# Altium PCB PCB1.PcbDoc (part 3 of 3)
Units mm, origin at the board's own origin, x right, y up, seen from the top; angles counter-clockwise.
Board outline 100 x 48 mm, 4 copper layers (Top Layer, Top GND, Bottom VM, Bottom Layer), stack 1.513 mm thick; 171 components, 136 nets, 609 pads, 571 vias.
Unrouted connection lines stored in the file: 44.
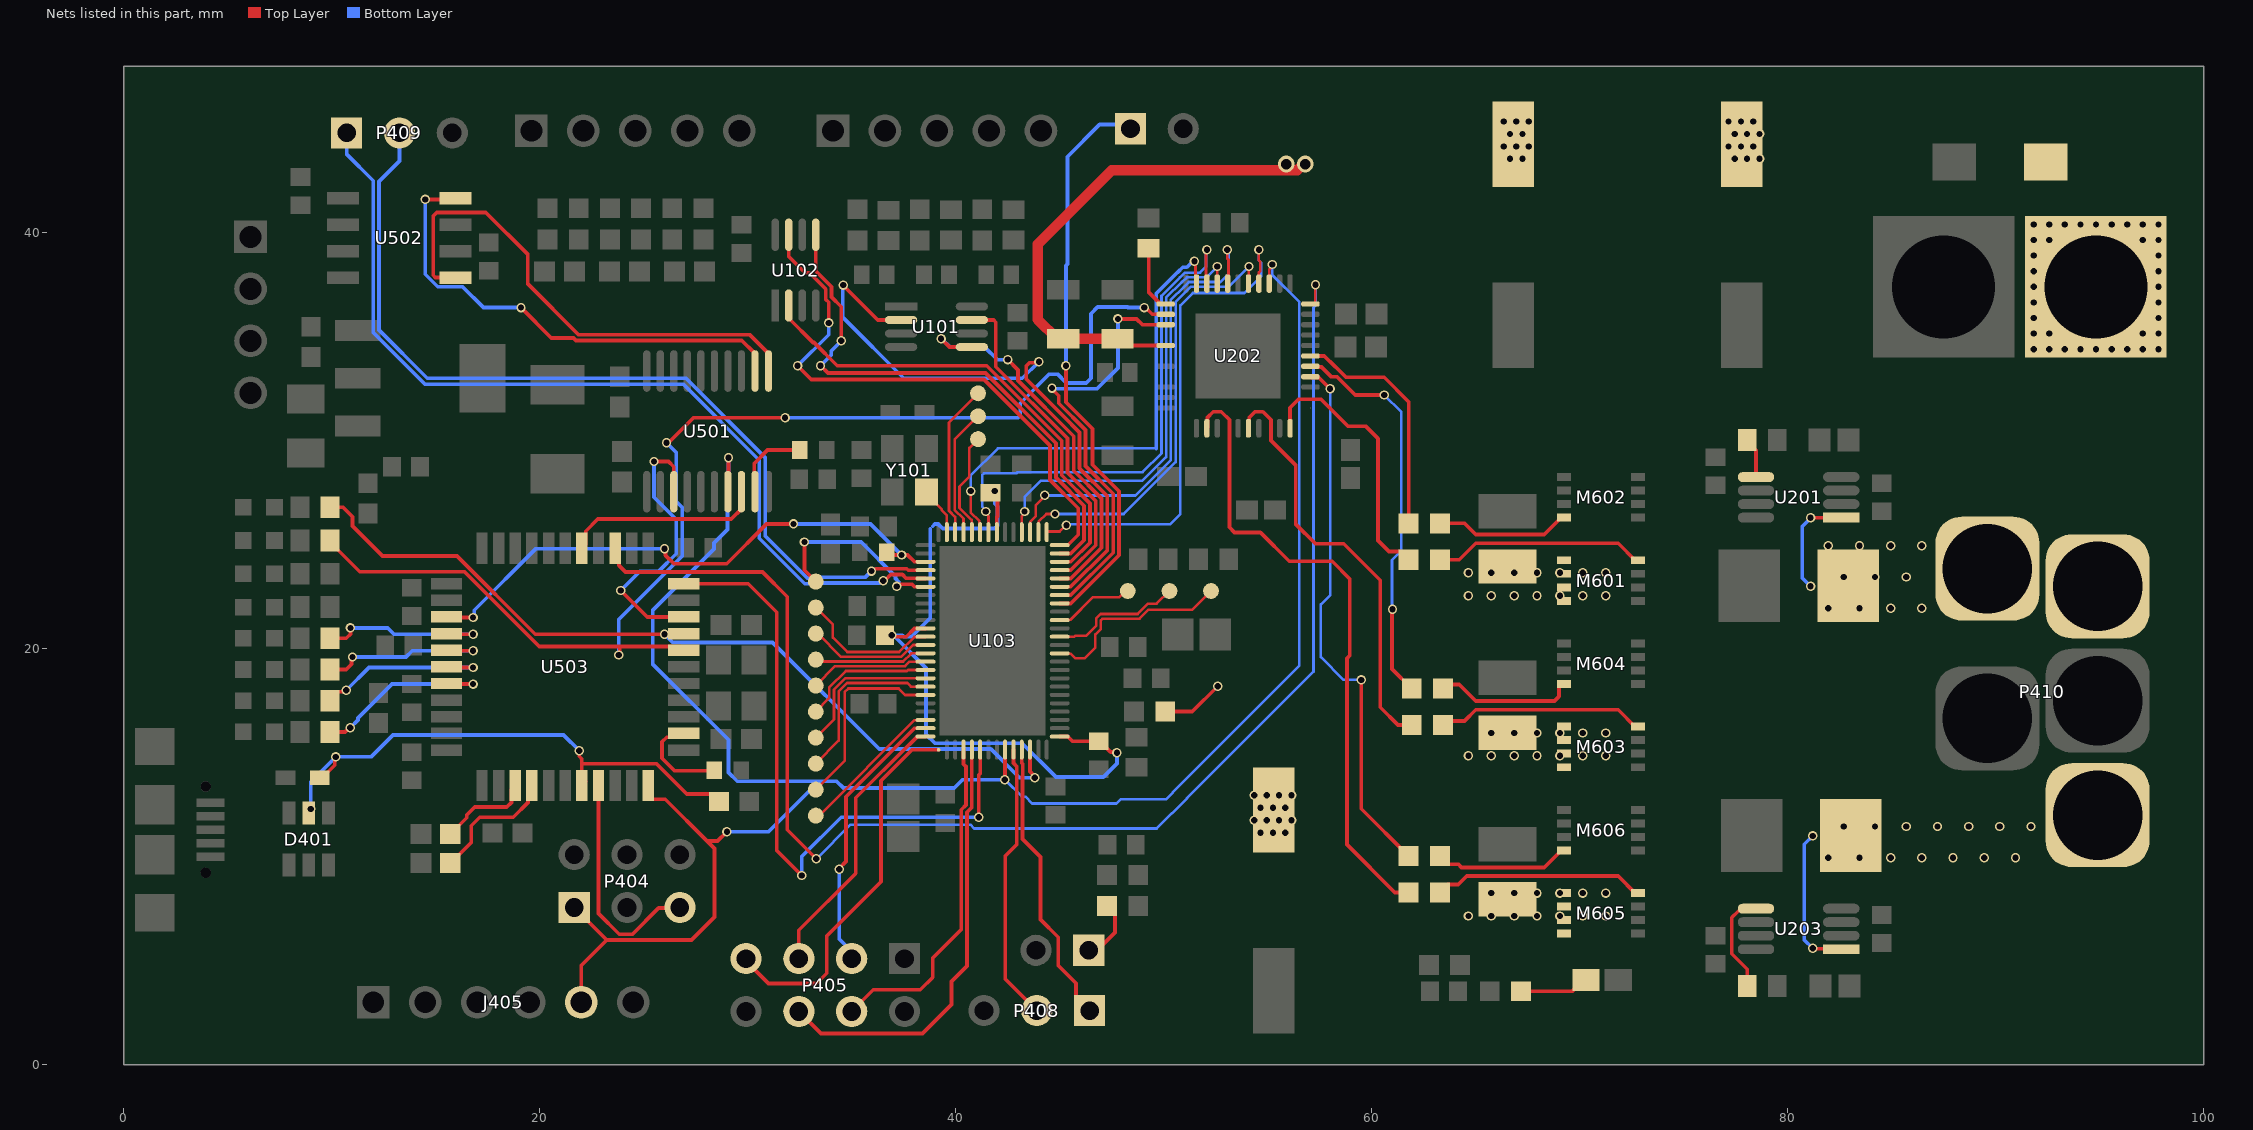
[diagram p5: the nets of this part, all layers, seen from the top]

## Via types
v1: diameter 0.45, hole 0.3, Top Layer to Bottom Layer, tented both sides, 488 vias
v2: diameter 0.45, hole 0.3, Top Layer to Bottom Layer, 77 vias
v3: diameter 4, hole 3, Top Layer to Bottom Layer, 4 vias
v4: diameter 0.8, hole 0.5, Top Layer to Bottom Layer, tented both sides, 2 vias

## Nets (pads, with @x,y where several pads share a name; then routed paths per layer and width w, separated by ;. In a path a pad name is that pad's centre, name@x,y a point inside that pad or via, vN(x,y) a via of type N, cw(c..) or ccw(c..) an arc to the next point about the centre after c; other vN are vias at no path point) (continued)
NetJ405_5: J405.5 P404.1 U103.9 U202.13 U501.17 U503.11 | length 99.1
  Top Layer w0.127: U202.13@55.077,37.557 55.077,38.241 55.22,38.383 v1(55.22,38.471)
  Top Layer w0.18: P404.1@21.66,7.56 23.225,5.995 ; J405.5@22,3 22,4.769 23.225,5.995 ; U503.11@25.227,13.427 25.227,12.952 25.412,12.767 26.033,12.767 28.05,10.75 ; v1(29,11.2) 28.55,10.75 28.05,10.75 ; U501.17@29.05,27.55 29.075,27.575 v1(29.075,29.175) ; v1(42.363,13.7) 42.375,13.712 42.375,15.149 U103.9@42.377,15.151 ; 23.225,5.995 27.295,5.995 28.4,7.1 28.4,10.4 28.05,10.75
  Bottom Layer w0.127: v1(42.363,13.7) 43.178,12.885 43.348,12.885 43.675,12.557 47.732,12.557 47.932,12.757 50.114,12.757 50.437,13.08 50.437,13.1 56.519,19.182 56.519,36.66 55.22,37.959 v1(55.22,38.471)
  Bottom Layer w0.18: v1(29,11.2) 31,11.2 33.431,13.631 ; v1(29.075,29.175) 29.075,27.268 29.031,27.224 29.031,25.736 28.38,25.085 28.38,24.791 25.431,21.842 25.431,19.27 29.075,15.626 29.075,14.05 29.494,13.631 33.431,13.631 ; v1(42.363,13.7) 40.327,13.7 39.927,13.3 34.6,13.3 34.269,13.631 33.431,13.631
NetM601_4: M601.4 R601.2 | length 10.2
  Top Layer w0.18: R601.2@63.277,24.277 64.214,24.277 65.005,25.068 71.849,25.068 72.665,24.252 M601.4@72.805,24.252
NetM602_4: M602.4 R602.2 | length 6.5
  Top Layer w0.127: M602.4@69.179,26.302 M602.4@69.249,26.302
  Top Layer w0.18: R602.2@63.278,26.027 64.464,26.027 65.005,25.486 68.293,25.486 69.109,26.302 M602.4@69.179,26.302
NetM603_4: M603.4 R604.2 | length 10
  Top Layer w0.127: M603.4@72.665,16.252 M603.4@72.805,16.252
  Top Layer w0.18: R604.2@63.428,16.327 63.628,16.527 64.464,16.527 65.005,17.068 71.849,17.068 M603.4@72.665,16.252
NetM604_4: M604.4 R605.2 | length 6.7
  Top Layer w0.18: R605.2@63.428,18.077 63.628,18.277 64.214,18.277 65.005,17.486 68.293,17.486 68.786,17.486 69.009,17.709 69.009,18.201 M604.4@69.109,18.302
NetM605_4: M605.4 R606.2 | length 10.2
  Top Layer w0.18: R606.2@63.278,8.277 63.278,8.28 63.666,8.668 64.166,8.668 64.566,9.068 71.849,9.068 72.665,8.252 M605.4@72.805,8.252
NetM606_4: M606.4 R607.2 | length 6.5
  Top Layer w0.18: R607.2@63.278,10.027 63.278,10.024 63.666,9.636 64.169,9.636 64.319,9.486 68.293,9.486 69.109,10.302 M606.4@69.249,10.302
NetP403_1: P403.1 R302.2 | length 3.2
  Top Layer w0.18: P403.1@46.4,5.5 46.6,5.3 47.662,6.362 47.662,7.242 R302.2@47.277,7.627
NetP404_5: P404.5 U503.8 | length 11
  Top Layer w0.18: U503.8@22.827,13.427 22.827,7.273 23.825,6.275 24.461,6.275 25.72,7.533 26.713,7.533 P404.5@26.74,7.56
NetP405_3: P405.3 U103.75 | length 13.4
  Top Layer w0.18: v1(34.4,9.4) 34.4,9.448 34.726,9.774 34.726,12.882 38.019,16.175 38.549,16.175 U103.75@38.551,16.177
  Bottom Layer w0.18: v1(34.4,9.4) 34.4,6.046 35,5.446 P405.3@35,5.1
NetP405_4: P405.4 U103.4 | length 16.2
  Top Layer w0.18: P405.4@35,2.56 36.04,3.6 38.3,3.6 38.9,4.2 38.9,5.133 40.265,6.498 40.265,12.253 40.491,12.479 40.491,14.336 40.377,14.45 U103.4@40.377,15.151
NetP405_5: P405.5 U103.76 | length 13.4
  Top Layer w0.18: P405.5@32.46,5.1 32.46,6.46 35.2,9.2 35.2,12.831 37.79,15.421 37.811,15.421 38.163,15.773 38.547,15.773 U103.76@38.551,15.777
NetP405_6: P405.6 U103.5 | length 21
  Top Layer w0.18: P405.6@32.46,2.56 33.52,1.5 38.4,1.5 39.8,2.9 39.8,4 40.545,4.745 40.545,12.137 40.777,12.369 U103.5@40.777,15.151
NetP405_7: P405.7 U103.1 | length 18.4
  Top Layer w0.18: P405.7@29.92,5.1 29.92,4.98 31,3.9 33.3,3.9 33.8,4.4 33.8,6.185 36.412,8.797 36.412,13.647 37.906,15.141 U103.1@39.177,15.141
NetP406_1: P406.1 U103.31 | length 27.8
  Top Layer w0.18: U103.31@45.003,22.177 45.005,22.179 45.535,22.179 47.853,24.497 47.853,27.566 46.577,28.842 46.577,30.573 45.3,31.85 v1(45.3,33.6)
  Bottom Layer w0.18: v1(45.3,33.6) 45.3,38.417 45.377,38.494 45.377,43.656 46.921,45.2 48.2,45.2 P406.1@48.4,45
NetP408_1: P408.1 U103.11 | length 13.9
  Top Layer w0.18: U103.11@43.177,15.151 43.179,15.149 43.179,14.497 43.219,14.456 43.219,13.905 43.212,13.897 43.212,10.855 44.075,9.992 44.075,6.979 44.928,6.126 44.928,4.765 45.78,3.913 45.78,3.26 P408.1@46.44,2.6
NetP408_2: P408.2 U103.10 | length 13.5
  Top Layer w0.18: U103.10@42.777,15.151 42.779,15.149 42.779,14.501 42.939,14.341 42.939,14.021 42.932,14.013 42.932,10.584 42.382,10.034 42.382,4.118 P408.2@43.9,2.6
NetP409_1: P409.1 U103.57 | length 44.2
  Top Layer w0.18: v1@36.465,23.221 v1(36.513,23.269) 36.586,23.269 36.883,23.566 37.438,23.566 37.613,23.391 38.123,23.391 38.135,23.379 38.549,23.379 U103.57@38.551,23.377
  Bottom Layer w0.18: P409.1@10.72,44.8 10.72,43.78 12,42.5 12,35.2 14.48,32.72 26.9,32.72 30.56,29.06 30.56,25.31 32.747,23.124 33.446,23.124 33.484,23.162 36.333,23.162 36.44,23.269 v1(36.513,23.269)
NetP409_2: P409.2 U103.56 | length 43.6
  Top Layer w0.127: v1@35.88,23.657 v1(35.954,23.731)
  Top Layer w0.18: v1(35.954,23.731) 36.027,23.731 36.142,23.846 37.65,23.846 37.719,23.777 U103.56@38.551,23.777
  Bottom Layer w0.18: P409.2@13.26,44.8 13.26,43.444 12.28,42.464 12.28,35.316 14.596,33 27.034,33 30.84,29.193 30.84,25.426 32.863,23.404 33.33,23.404 33.368,23.442 35.665,23.442 v1(35.954,23.731)
NetP410_1: P410.1 R603.2 U201.1 | length 5.1
  Top Layer w0.18: v1(81.1,26.3) v1(81.1,26.3) 82.576,26.301 U201.1@82.577,26.302
  Bottom Layer w0.18: v1(81.1,23) 80.7,23.4 80.7,25.873 81.1,26.273 v1(81.1,26.3)
  other v1: 81.95,21.95 83.45,21.95 84.95,21.95 86.45,21.95 82.7,23.45 84.2,23.45 85.7,23.45 81.95,24.95 83.45,24.95 84.95,24.95 86.45,24.95
NetP410_3: P410.3 R608.2 U203.1 | length 7.1
  Top Layer w0.18: v1(81.2,5.6) 81.224,5.576 82.553,5.576 U203.1@82.577,5.552
  Bottom Layer w0.18: v1(81.2,5.6) 80.8,6 80.8,10.6 v1(81.2,11)
  other v1: 81.95,9.95 83.45,9.95 84.95,9.95 86.45,9.95 87.95,9.95 89.45,9.95 90.95,9.95 82.7,11.45 84.2,11.45 85.7,11.45 87.2,11.45 88.7,11.45 90.2,11.45 91.7,11.45
NetR113_1: R113.1 U103.55 U503.36 | length 27.4
  Top Layer w0.18: U503.36@15.527,21.527 15.554,21.5 v1(16.8,21.5) ; v1(26,24.8) 26.052,24.748 26.052,24.488 26.455,24.085 28.99,24.085 30.905,26 v1(32.2,26) ; R113.1@36.557,24.508 v1(37.4,24.508) 37.69,24.508 38.019,24.179 38.549,24.179 U103.55@38.551,24.177
  Bottom Layer w0.18: v1(16.8,21.5) 16.852,21.552 16.852,21.852 19.8,24.8 v1(26,24.8) ; v1(32.2,26) 35.908,26 v1(37.4,24.508)
NetR201_1: R201.1 U202.22 | length 3.2
  Top Layer w0.18: R201.1@49.277,39.252 49.277,37.143 49.843,36.577 U202.22@50.097,36.577
NetR202_1: R202.1 U201.5 | length 2
  Top Layer w0.18: R202.1@78.052,30.027 78.052,29.952 78.477,29.527 U201.5@78.477,28.252
NetR203_1: R203.1 U203.5 | length 4.9
  Top Layer w0.18: R203.1@78.052,3.777 78.052,4.591 77.309,5.333 77.309,7.071 77.619,7.38 77.635,7.38 77.757,7.502 U203.5@78.477,7.502
NetR307_1: R307.1 R308.2 | length 3.4
  Top Layer w0.18: R308.2@67.177,3.527 69.627,3.527 70.177,4.077 R307.1@70.301,4.077
NetR501_1: R501.1 U501.19 | length 3.8
  Top Layer w0.18: U501.19@30.35,27.55 30.317,27.583 30.317,28.728 30.315,28.73 30.315,28.91 30.955,29.55 R501.1@32.5,29.55
NetR502_2: R502.2 U503.4 | length 6.3
  Top Layer w0.18: R502.2@15.701,9.7 15.725,9.7 16.714,10.689 16.714,11.486 17.124,11.896 18.731,11.896 19.442,12.607 19.442,13.242 U503.4@19.627,13.427
NetR503_2: R503.2 U503.3 | length 4.5
  Top Layer w0.18: R503.2@15.701,11.1 15.725,11.1 16.497,11.872 16.497,12.004 16.881,12.387 18.422,12.387 18.642,12.607 18.642,13.242 U503.3@18.827,13.427
NetR504_1: R504.1 U503.13 | length 4.8
  Top Layer w0.18: U503.13@26.927,15.927 26.742,15.742 26.107,15.742 25.887,15.522 25.887,14.732 26.492,14.127 28.377,14.127 R504.1@28.4,14.15
NetR505_2: R505.2 U202.23 U503.18 | length 60.9
  Top Layer w0.18: R505.2@9.925,25.125 R505.2@9.925,25.2 ; R505.2@10,25.3 10,25.05 11.35,23.7 16.389,23.7 16.567,23.522 19.977,20.112 23.9,20.112 ; v1(23.8,19.7) 23.852,19.752 23.852,20.064 23.9,20.112 ; v1@26.15,29.85 27.4,31.1 v1(31.8,31.1) ; U503.18@26.927,19.927 26.742,20.112 23.9,20.112 ; v1(49.07,36.4) 49.123,36.4 49.446,36.077 U202.23@50.097,36.077
  Bottom Layer w0.18: v1(23.8,19.7) 23.8,21.399 26.849,24.448 26.849,26.8 26.569,27.08 26.569,29.431 v1(26.1,29.9) ; v1(31.8,31.1) 42.995,31.1 43.1,31.205 43.1,31.8 44.5,33.2 44.895,33.2 45.315,32.78 46.28,32.78 46.5,33 46.5,36.1 46.825,36.425 48.257,36.425 48.282,36.4 v1(49.07,36.4)
NetR506_2: R506.2 U103.12 U503.19 | length 41.8
  Top Layer w0.18: R506.2@10,26.8 10.545,26.8 11.004,26.341 11.004,25.901 12.445,24.46 16.025,24.46 19.785,20.7 v1(26,20.7) 26.9,20.7 U503.19@26.927,20.727 ; U103.12@43.577,15.151 43.577,14.096 43.8,13.873 v1(43.8,13.8)
  Bottom Layer w0.18: v1(26,20.7) 26.4,20.3 31.2,20.3 36.324,15.176 41.692,15.176 43.068,13.8 v1(43.8,13.8)
NetR507_2: R507.2 U503.37 | length 8.7
  Top Layer w0.18: R507.2@9.925,20.5 10.7,20.5 10.9,20.7 v1(10.9,21) v1@10.848,20.948 ; U503.37@15.527,20.727 15.554,20.7 v1(16.8,20.7)
  Bottom Layer w0.18: v1(10.9,21) 12.695,21 12.995,20.7 v1(16.8,20.7)
NetR508_2: R508.2 U503.38 | length 8.9
  Top Layer w0.18: R508.2@9.8,19 R508.2@9.925,19 10.7,19 10.948,19.248 10.948,19.548 v1(11,19.6) v1@11,19.527 ; U503.38@15.527,19.927 15.554,19.9 v1(16.8,19.9)
  Bottom Layer w0.18: v1(11,19.6) 13.574,19.6 13.874,19.9 v1(16.8,19.9)
NetR509_2: R509.2 U503.39 | length 8.9
  Top Layer w0.18: R509.2@9.9,17.5 9.9,17.55 10.285,17.935 10.562,17.935 10.627,18 v1(10.7,18) ; U503.39@15.527,19.127 15.554,19.1 v1(16.8,19.1)
  Bottom Layer w0.18: v1(10.7,18) 11.8,19.1 v1(16.8,19.1)
NetR510_2: R510.2 U503.40 | length 9.1
  Top Layer w0.18: R510.2@10,16 10.645,16 10.847,16.202 v1(10.898,16.202) ; U503.40@15.527,18.327 15.554,18.3 v1(16.8,18.3)
  Bottom Layer w0.18: v1(10.898,16.202) 11.264,16.568 11.264,16.664 12.9,18.3 v1(16.8,18.3)
NetR601_1: R601.1 U202.37 | length 12.9
  Top Layer w0.18: U202.37@56.077,30.597 56.077,31.587 56.484,31.994 57.558,31.994 58.852,30.7 59.7,30.7 60.3,30.1 60.3,25.2 60.832,24.668 61.387,24.668 61.775,24.28 R601.1@61.775,24.277 R601.1@61.775,24.274
NetR602_1: R602.1 U202.5 | length 11.5
  Top Layer w0.18: U202.5@57.057,34.077 57.724,34.077 58.237,33.563 58.246,33.563 58.76,33.049 60.6,33.049 61.776,31.873 R602.1@61.776,26.027
NetR604_1: R604.1 U202.34 | length 20.5
  Top Layer w0.18: U202.34@54.077,30.597 54.111,30.631 54.111,31.12 54.386,31.395 54.768,31.395 55.16,31.004 55.16,30.014 56.344,28.83 56.344,26 57.298,25.046 58.654,25.046 60.408,23.292 60.408,17.182 61.263,16.327 R604.1@61.926,16.327
NetR605_1: R605.1 U202.4 | length 19.2
  Top Layer w0.18: U202.4@57.057,33.577 57.091,33.543 57.589,33.543 58.063,33.069 58.344,33.069 59.213,32.2 v1(60.6,32.2) ; v1(61,21.9) 60.977,21.877 60.977,19.029 61.926,18.08 R605.1@61.926,18.077
  Bottom Layer w0.127: v1(60.6,32.2) 61.427,31.373 61.427,24.713 60.977,24.263 60.977,21.923 v1(61,21.9)
NetR606_1: R606.1 U202.31 | length 30.6
  Top Layer w0.18: U202.31@52.077,30.597 52.111,30.631 52.111,31.12 52.386,31.395 52.768,31.395 53.16,31.004 53.16,25.836 53.404,25.592 54.648,25.592 56.04,24.2 58.1,24.2 58.949,23.351 58.949,19.67 58.808,19.529 58.808,10.582 61.113,8.277 R606.1@61.776,8.277
NetR607_1: R607.1 U202.3 | length 26.1
  Top Layer w0.18: U202.3@57.057,33.077 57.091,33.043 57.457,33.043 v1(58,32.5) ; v1(59.5,18.5) 59.5,12.306 61.776,10.03 R607.1@61.776,10.027
  Bottom Layer w0.127: v1(58,32.5) 58,22.567 57.557,22.125 57.557,19.597 58.654,18.5 v1(59.5,18.5)
NetTP101_1: TP101.1 U103.58 | length 8.9
  Top Layer w0.18: v1(32.727,25.127) 32.727,23.777 TP101.1@33.277,23.227 ; v1(37.162,22.997) v1@37.187,22.972 ; v1@37.314,23.099 37.897,23.099 38.017,22.979 38.549,22.979 U103.58@38.551,22.977
  Bottom Layer w0.18: v1(32.727,25.127) 35.461,25.127 37.111,23.478 37.111,23.375 37.289,23.197 ; v1(37.162,22.997) v1@37.162,23.07
NetTP102_1: TP102.1 U103.66 | length 5.5
  Top Layer w0.127: TP102.1@33.277,19.477 33.37,19.384 37.474,19.384 37.867,19.777 U103.66@38.551,19.777
NetTP103_1: TP103.1 U103.50 | length 7.4
  Top Layer w0.127: U103.50@39.977,25.602 39.977,26.332 39.677,26.632 39.677,30.877 TP103.1@41.077,32.277
NetTP104_1: TP104.1 U103.65 | length 6
  Top Layer w0.127: TP104.1@33.277,20.727 33.377,20.727 34.492,19.611 37.38,19.611 37.946,20.177 U103.65@38.551,20.177
NetTP105_1: TP105.1 U103.64 | length 6.8
  Top Layer w0.127: TP105.1@33.277,21.977 34.094,21.16 34.094,20.534 34.789,19.838 37.286,19.838 38.012,20.564 38.539,20.564 U103.64@38.551,20.577
NetTP106_1: TP106.1 U103.68 | length 6.4
  Top Layer w0.127: TP106.1@33.277,16.977 33.922,17.622 33.922,18.132 34.72,18.93 37.662,18.93 37.709,18.977 U103.68@38.551,18.977
NetTP107_1: TP107.1 U103.70 | length 8.3
  Top Layer w0.127: TP107.1@33.277,14.477 34.376,15.576 34.376,17.944 34.781,18.35 37.677,18.35 37.85,18.177 U103.70@38.551,18.177
NetTP108_1: TP108.1 U103.67 | length 5.8
  Top Layer w0.127: TP108.1@33.277,18.227 34.208,19.157 37.568,19.157 37.788,19.377 U103.67@38.551,19.377
NetTP109_1: TP109.1 U103.71 | length 9.3
  Top Layer w0.127: TP109.1@33.277,13.227 34.66,14.61 34.66,17.908 34.841,18.089 37.259,18.089 37.571,17.777 U103.71@38.551,17.777
NetTP110_1: TP110.1 U103.69 | length 7.3
  Top Layer w0.127: TP110.1@33.277,15.727 34.149,16.599 34.149,18.038 34.687,18.577 U103.69@38.551,18.577
NetTP111_1: TP111.1 U103.74 | length 7.1
  Top Layer w0.127: TP111.1@33.277,11.977 33.444,11.977 38.032,16.564 U103.74@38.442,16.564 ; U103.74@38.539,16.564 U103.74@38.551,16.577
NetTP112_1: TP112.1 U103.48 | length 5.1
  Top Layer w0.127: U103.48@40.777,25.602 40.764,25.615 40.764,26.187 40.181,26.771 40.181,27.802 40.656,28.277 40.656,29.656 TP112.1@41.077,30.077
NetTP113_1: TP113.1 U103.49 | length 6.2
  Top Layer w0.127: U103.49@40.377,25.602 40.377,26.253 39.954,26.677 39.954,30.053 TP113.1@41.077,31.177
NetTP301_1: TP301.1 U103.29 | length 3.9
  Top Layer w0.127: U103.29@45.003,21.377 45.015,21.39 45.508,21.39 46.589,22.47 47.85,22.47 48.156,22.777 TP301.1@48.277,22.777
NetTP302_1: TP302.1 U103.27 | length 6.4
  Top Layer w0.127: U103.27@45.003,20.577 45.708,20.577 45.752,20.621 46.274,20.621 46.75,21.097 46.75,21.45 46.971,21.671 48.75,21.671 49.242,22.163 49.663,22.163 TP302.1@50.277,22.777
NetTP303_1: TP303.1 U103.25 | length 9.3
  Top Layer w0.127: U103.25@45.003,19.777 45.015,19.764 45.524,19.764 45.752,19.536 46.202,19.536 46.713,20.048 46.713,20.681 46.977,20.944 46.977,21.356 47.065,21.444 48.844,21.444 49.277,21.877 51.377,21.877 TP303.1@52.277,22.777
NetU101_2: U101.2 U103.33 | length 33.4
  Top Layer w0.127: 45.508,22.99 47.293,24.774 47.32,24.801 47.32,25.477
  Top Layer w0.18: v1(34.597,37.48) 34.597,37.457 36.252,35.802 U101.2@37.377,35.802 ; v1(44,33.8) 43.948,33.748 43.553,33.748 43.397,33.592 43.397,32.961 45.177,31.181 45.177,31.177 45.957,30.397 45.957,28.67 47.293,27.334 47.293,24.774 47.293,24.737 45.535,22.979 45.005,22.979 U103.33@45.003,22.977
  Bottom Layer w0.18: v1(34.597,37.48) 34.577,37.46 34.577,35.923 37.5,33 43.2,33 v1(44,33.8)
NetU101_5: U101.5 U103.34 | length 18.8
  Top Layer w0.18: v1(39.3,34.9) 39.698,34.502 U101.5@40.777,34.502 ; v1(42.5,33.898) 42.993,33.404 42.993,32.893 45.677,30.21 45.677,28.554 47.013,27.218 47.013,24.857 45.535,23.379 45.005,23.379 U103.34@45.003,23.377
  Bottom Layer w0.18: v1(39.3,34.9) 39.327,34.9 39.727,34.5 41.392,34.5 41.994,33.898 v1(42.5,33.898)
NetU101_7: U101.7 U103.35 | length 16.1
  Top Layer w0.18: U101.7@40.777,35.802 41.824,35.802 41.931,35.696 41.931,33.56 45.377,30.113 45.377,28.458 46.733,27.102 46.733,24.977 45.535,23.779 45.005,23.779 U103.35@45.003,23.777
NetU102_2: U102.2 U103.36 | length 23.5
  Top Layer w0.18: U102.2@31.975,36.5 31.975,35.885 33.143,34.717 33.188,34.717 34.305,33.6 41.495,33.6 45.097,29.997 45.097,28.342 46.453,26.986 46.453,25.097 45.535,24.179 45.005,24.179 U103.36@45.003,24.177
NetU102_5: U102.5 U103.37 | length 26.7
  Top Layer w0.18: U102.5@33.275,39.9 33.275,38.161 34.033,37.403 34.033,36.909 34.5,36.442 v1(34.5,34.8) ; v1(33.5,33.6) 33.518,33.6 33.859,33.259 41.44,33.259 44.817,29.881 44.817,28.226 46.173,26.87 46.173,25.217 45.535,24.579 45.005,24.579 U103.37@45.003,24.577
  Bottom Layer w0.18: v1(33.5,33.6) 34.018,34.118 34.018,34.318 v1(34.5,34.8)
NetU102_7: U102.7 U103.38 | length 27.5
  Top Layer w0.18: U102.7@31.975,39.9 31.975,38.853 32.758,38.07 32.97,38.07 33.753,37.287 33.753,36.793 33.894,36.652 v1(33.894,35.662) ; v1(32.4,33.6) 33.052,32.948 41.355,32.948 44.537,29.765 44.537,28.11 45.893,26.754 45.893,25.483 45.387,24.977 U103.38@45.003,24.977
  Bottom Layer w0.18: v1(32.4,33.6) 33.894,35.094 v1(33.894,35.662)
NetU103_6: U103.6 U503.22 | length 31.7
  Top Layer w0.18: U503.22@26.927,23.127 30.028,23.127 31.4,21.755 31.4,10.3 v1(32.6,9.1) ; v1(41.114,11.901) 41.114,13.937 41.177,14 U103.6@41.177,15.151
  Bottom Layer w0.18: v1(32.6,9.1) 32.6,10.005 34.497,11.901 v1(41.114,11.901)
NetU103_32: U103.32 U202.24 | length 20.9
  Top Layer w0.18: v1(44.634,32.529) 44.634,32.48 44.957,32.157 44.957,31.797 46.237,30.517 46.237,28.786 47.573,27.45 47.573,24.617 45.535,22.579 45.005,22.579 U103.32@45.003,22.577 ; v1(47.8,35.856) 48.7,35.856 48.979,35.577 U202.24@50.097,35.577
  Bottom Layer w0.18: v1(44.634,32.529) 44.663,32.5 46.8,32.5 47.8,33.5 v1(47.8,35.856)
NetU103_39: U103.39 U202.14 | length 24.3
  Top Layer w0.127: U103.39@44.377,25.602 44.407,25.633 44.407,25.634 45,25.634 45.3,25.934 v1(45.324,25.934) ; U202.14@54.577,37.557 54.577,38.083 54.646,38.152 54.646,38.602 54.577,38.671 v1(54.577,39.177)
  Bottom Layer w0.127: v1(45.324,25.934) 45.367,25.977 50.3,25.977 50.8,26.477 50.8,36.5 51.4,37.1 53.877,37.1 54.677,37.9 54.677,38.571 54.577,38.671 v1(54.577,39.177)
NetU103_40: U103.40 U202.15 | length 21
  Top Layer w0.127: U103.40@43.977,25.602 43.99,25.615 43.99,26.108 44.358,26.477 v1(44.777,26.477) ; U202.15@54.077,37.557 54.09,37.57 54.09,38.364 v1(54.104,38.377)
  Bottom Layer w0.127: v1(44.777,26.477) 48.077,26.477 50.573,28.973 50.573,36.673 51.3,37.4 53.127,37.4 v1(54.104,38.377)
NetU103_41: U103.41 U202.17 | length 22.7
  Top Layer w0.127: U103.41@43.577,25.602 43.59,25.615 43.59,26.108 43.855,26.373 43.855,26.902 44.277,27.324 v1(44.277,27.377) ; v1(53.051,39.177) 53.056,39.172 53.056,38.761 53.12,38.698 53.12,37.599 U202.17@53.077,37.557
  Bottom Layer w0.127: v1(44.277,27.377) 44.288,27.366 48.645,27.366 50.346,29.067 50.346,36.779 50.967,37.4 50.979,37.4 51.206,37.627 52.727,37.627 53.12,38.02 53.12,39.021 53.051,39.09 v1(53.051,39.177)
NetU103_42: U103.42 U202.18 | length 20.9
  Top Layer w0.127: U103.42@43.177,25.602 43.177,26.375 43.312,26.511 v1(43.312,26.598) ; U202.18@52.577,37.557 v1(52.577,38.377)
  Bottom Layer w0.127: v1(43.312,26.598) 43.312,27.293 44.096,28.077 48.977,28.077 50.119,29.219 50.119,36.873 50.873,37.627 50.885,37.627 51.112,37.854 52.054,37.854 v1(52.577,38.377)
NetU103_46: U103.46 U202.19 | length 24.7
  Top Layer w0.127: v1(41.442,26.598) 41.442,26.511 41.577,26.375 U103.46@41.577,25.602 ; U202.19@52.077,37.557 52.035,37.599 52.035,39.134 v1(52.077,39.177)
  Bottom Layer w0.127: v1(41.442,26.598) 41.442,26.669 41.277,26.834 41.277,28.36 41.351,28.434 42.919,28.434 42.975,28.491 48.991,28.491 49.892,29.392 49.892,36.967 50.779,37.854 50.791,37.854 51.018,38.081 51.748,38.081 52.035,38.367 52.035,39.134 v1(52.077,39.177)
NetU103_47: U103.47 U202.20 | length 23.4
  Top Layer w0.127: v1(40.723,27.577) 40.723,26.55 41.137,26.136 41.137,26.05 41.164,26.022 41.164,25.615 U103.47@41.177,25.602 ; v1(51.477,38.623) 51.533,38.567 51.533,37.601 U202.20@51.577,37.557
  Bottom Layer w0.127: v1(40.723,27.577) 40.723,28.323 42.03,29.63 49.639,29.63
  Bottom Layer w0.18: 49.639,29.63 49.639,37.072 50.674,38.107 50.686,38.107 50.913,38.334 51.115,38.334 51.404,38.623 v1(51.477,38.623)
NetU103_51: U103.51 Y101.3 | length 2.3
  Top Layer w0.127: Y101.3@38.602,27.527 38.602,27.427 39.333,26.696 39.333,26.656 39.577,26.411 U103.51@39.577,25.602
NetU202_10: U202.10 U503.25 | length 70.3
  Top Layer w0.127: U202.10@57.057,36.577 57.228,36.577 57.29,36.638 57.29,37.49 v1(57.3,37.5)
  Top Layer w0.18: U503.25@23.627,24.827 23.812,24.642 23.812,24.007 24.127,23.692 30.708,23.692 31.9,22.5 31.9,11.3 v1(33.3,9.9)
  Bottom Layer w0.127: v1(33.3,9.9) 34.943,11.543 40.706,11.543 40.889,11.359 49.659,11.359 50.382,12.082 50.402,12.082 51.118,12.798 51.118,12.818 57.2,18.9 57.2,36.406 57.3,36.506 v1(57.3,37.5)
NetU501_1: U501.1 U502.1 | length 24
  Top Layer w0.18: U502.1@15.95,37.845 14.99,37.845 14.885,37.95 14.885,40.805 15.055,40.975 17.41,40.975 19.432,38.953 19.432,37.528 21.86,35.1 30.083,35.1 30.948,34.234 U501.1@30.948,34
NetU501_2: U501.2 U502.4 | length 23.3
  Top Layer w0.18: v1(14.5,41.6) U502.4@15.9,41.6 ; v1(19.1,36.4) 20.56,34.94 21.624,34.94 21.744,34.82 29.713,34.82 30.298,34.234 30.298,33.402 U501.2@30.35,33.35
  Bottom Layer w0.18: v1(14.5,41.6) 14.5,38 15.1,37.4 16.295,37.4 17.295,36.4 v1(19.1,36.4)
NetU501_13: U501.13 U503.20 | length 14.1
  Top Layer w0.18: v1(23.9,22.8) 25.173,21.527 U503.20@26.927,21.527 ; v1(25.5,29) 26.2,29 26.45,28.75 U501.13@26.45,27.55
  Bottom Layer w0.18: v1(23.9,22.8) 24.808,23.708 25.713,23.708 26.569,24.564 26.569,26.211 25.5,27.28 v1(25.5,29)
NetU501_18: U501.18 U503.27 | length 9.7
  Top Layer w0.18: U503.27@22.027,24.827 22.212,25.012 22.212,25.647 22.797,26.232 29.215,26.232 29.7,26.717 U501.18@29.7,27.55
VBUS: C510.1 D401.5 FB401.1 U503.7 | length 26.4
  Top Layer w0.18: D401.5@8.9,12.1 8.9,12.2 v1(9,12.3) ; FB401.1@9.425,13.8 9.55,13.8 10.148,14.398 10.148,14.748 v1(10.2,14.8) ; v1(21.9,15.1) 21.9,14.83 22.027,14.703 22.027,14.5 ; U503.7@22.212,13.612 U503.7@22.027,13.427 22.027,14.5 ; C510.1@28.623,12.65 28.257,13.016 27.073,13.016 25.622,14.467 22.06,14.467 22.027,14.5
  Bottom Layer w0.18: v1(9,12.3) 9,13.6 v1(10.2,14.8) 11.895,14.8 12.945,15.85 21.15,15.85 v1(21.9,15.1)
VCC_CORE: C301.2 C302.2 C303.2 U103.15 U103.45 U103.63 | length 35.3
  Top Layer w0.18: C301.2@36.6,20.65 v1(36.925,20.65) 36.925,20.587 36.935,20.577 37.621,20.577 38.019,20.975 38.549,20.975 U103.63@38.551,20.977 ; v1(41.873,27.577) 41.752,27.577 C302.2@41.677,27.502 42.011,27.168 42.011,26.362 41.977,26.329 U103.45@41.977,25.602 ; U103.15@45.003,15.777 45.39,15.777 45.615,15.552 C303.2@46.877,15.552 46.927,15.552 47.45,15.029 47.725,15.029 v1(47.751,15.003)
  Bottom Layer w0.18: v1(36.925,20.65) v1@37.077,20.65 ; 38.775,25.765 38.775,21.475 37.877,20.577 37.51,20.577 37.437,20.65 v1@37.077,20.65 ; 38.902,25.892 39.008,25.997 39.157,25.997 39.377,25.777 41.872,25.777 42.011,25.916 42.011,26.834 41.877,26.967 41.877,27.573 v1(41.873,27.577) ; v1(47.751,15.003) 47.751,14.482 47.1,13.831 44.818,13.831 43.194,15.456 39.004,15.456 38.577,15.882 38.577,19.077 37.077,20.577 v1@37.077,20.65
VM: *401.1 C316.1 C318.1 C322.2 C323.2 C324.2 C601.1 C602.1 C603.1 D402.2 M601.5 M601.6 M601.7 M601.8 M603.5 M603.6 M603.7 M603.8 M605.5 M605.6 M605.7 M605.8 R304.2 U202.25 | length 27.8
  Top Layer w0.18: C318.1@47.777,34.902 48.102,34.577 U202.25@50.097,34.577 ; R304.2@50.077,16.977 51.377,16.977 v1(52.6,18.2)
  Top Layer w0.5: C318.1@47.777,34.902 C316.1@45.177,34.902 44.877,34.902 43.952,35.827 43.952,39.452 47.5,43 v4@55.9,43 ; v4(55.9,43.3) v4@56,43.2 ; v4@56,43 56.419,43 56.719,43.3 v4(56.8,43.3)
  other v1: 64.65,7.15 65.75,7.15 66.85,7.15 67.95,7.15 69.05,7.15 70.15,7.15 71.25,7.15 65.75,8.25 66.85,8.25 67.95,8.25 69.05,8.25 70.15,8.25 71.25,8.25 54.65,11.15 55.25,11.15 55.85,11.15 54.35,11.75 54.95,11.75 55.55,11.75 56.15,11.75 54.65,12.35 55.25,12.35 55.85,12.35 54.35,12.95 54.95,12.95 55.55,12.95 56.15,12.95 64.65,14.85 65.75,14.85 66.85,14.85 67.95,14.85 69.05,14.85 70.15,14.85 71.25,14.85 65.75,15.95 66.85,15.95 67.95,15.95 69.05,15.95 70.15,15.95 71.25,15.95 64.65,22.55 65.75,22.55 66.85,22.55 67.95,22.55 69.05,22.55 70.15,22.55 71.25,22.55 64.65,23.65 65.75,23.65 66.85,23.65 67.95,23.65 69.05,23.65 70.15,23.65 71.25,23.65 66.65,43.55 67.25,43.55 77.45,43.55 78.05,43.55 78.65,43.55 66.35,44.15 66.95,44.15 67.55,44.15 77.15,44.15 77.75,44.15 78.35,44.15 66.65,44.75 67.25,44.75 77.45,44.75 78.05,44.75 78.65,44.75 66.35,45.35 66.95,45.35 67.55,45.35 77.15,45.35 77.75,45.35 78.35,45.35
  other v2: 91.825,34.4 92.575,34.4 93.325,34.4 94.075,34.4 94.825,34.4 95.575,34.4 96.325,34.4 97.075,34.4 97.825,34.4 91.825,35.15 92.575,35.15 97.075,35.15 97.825,35.15 91.825,35.9 97.825,35.9 91.825,36.65 97.825,36.65 91.825,37.4 97.825,37.4 91.825,38.15 97.825,38.15 91.825,38.9 97.825,38.9 91.825,39.65 92.575,39.65 97.075,39.65 97.825,39.65 91.825,40.4 92.575,40.4 93.325,40.4 94.075,40.4 94.825,40.4 95.575,40.4 96.325,40.4 97.075,40.4 97.825,40.4
pads on no net: D401.1 D401.3 J401.MH1 J401.MH2 P405.2 U201.4 U202.2 U203.4 U501.3 U501.4 U501.5 U501.6 U501.7 U501.11 U501.12 U501.15 U502.8 U503.1 U503.2 U503.12 U503.21 U503.28 U503.29 U503.30 U503.31 U503.32 U503.33 U503.41

## Polygon pours and split planes (outlines as drawn)
GND on Top Layer "GND_L01_P018" (solid, remove dead copper, pour order 18): 0,0 0,48 100,48 100,0
VM on Top Layer "VM_L01_P001" (solid, pour order 1): 91.4,44.3 91.4,34 98.2,34 98.2,40.7 96.1,42.8 94.9,42.8 93.4,44.3
+3.3 on Top Layer "+3.3_L01_P013" (solid, pour order 13): 7.9,31.1 12.8,31.1 12.8,27.8 12.5,27.5 9.5,27.5 7.9,29.1
VM on Top Layer "VM_L01_P017" (solid, pour order 17): 53.5,14.3 53.5,10.2 57.1,10.2 57.1,14.3
VM on Top Layer "VM_L01_P016" (solid, pour order 16): 76,46.3 76,42.2 79.6,42.2 79.6,46.3
VM on Top Layer "VM_L01_P015" (solid, pour order 15): 64.986,46.3 64.986,42.2 68.586,42.2 68.586,46.3
NetC203_2 on Top Layer "NETC203_2_L01_P002" (solid, pour order 2): 80.1,20.6 80.4,20.9 80.4,25.4 80.1,25.7 77.3,25.7 75.4,27.6 75.4,28.8 75.2,29 70.367,29 70.367,25.833 70.9,25.3 72.5,25.3 73.3,24.5 73.3,23.8 72.4,23.8 72.4,22.1 72.5,22 72.5,21.4 73.8,21.4 74.6,20.6
GND on Top Layer "GND_L01_P010" (solid, pour order 10): 63.1,29.3 69.5,29.3 69.7,29.1 69.7,26.8 69.6,26.7 68.8,26.7 67.9,25.8 65.1,25.8 64,26.9 62.8,26.9 62.8,29
VM on Top Layer "VM_L01_P003" (solid, pour order 3): 65.1,24.8 71.687,24.8 71.687,22.032 64.168,22.032 63.7,22.5 63.7,23.4
+3.3 on Top Layer "+3.3_L01_P014" (solid, pour order 14): 36.8,13.6 37.6,14.4 39.3,14.4 39.427,14.274 39.427,12.3 36.8,12.3
NetP410_3 on Top Layer "NETP410_3_L01_P009" (solid, pour order 9): 81,13.1 80.8,12.9 80.8,8.8 81,8.6 97,8.6 97.6,9.2 97.6,13.7 96.8,14.5 93.1,14.5 91.7,13.1
GND on Top Layer "GND_L01_P012" (solid, pour order 12): 63.1,13.3 69.5,13.3 69.7,13.1 69.7,10.8 69.6,10.7 68.8,10.7 67.9,9.8 65.1,9.8 64,10.9 62.8,10.9 62.8,13
GND on Top Layer "GND_L01_P011" (solid, pour order 11): 63.1,21.3 69.5,21.3 69.7,21.1 69.7,18.8 69.6,18.7 68.8,18.7 67.9,17.8 65.1,17.8 64,18.9 62.8,18.9 62.8,21
NetP410_1 on Top Layer "NETP410_1_L01_P008" (solid, pour order 8): 81,25.7 80.7,25.4 80.7,20.9 81,20.6 96.5,20.6 97.4,21.5 97.4,25.9 96.7,26.6 85.8,26.6 84.9,25.7
NetC205_2 on Top Layer "NETC205_2_L01_P007" (solid, pour order 7): 70.367,20.522 70.367,17.733 70.7,17.4 72.4,17.4 73.3,16.5 73.3,15.9 73.2,15.8 72.5,15.8 72.5,14.1 72.9,13.7 90.9,13.7 92.4,15.2 96.6,15.2 97.2,15.8 97.2,19.1 96.3,20 85.7,20 74.4,20 73.7,20.7 70.545,20.7
NetC206_2 on Top Layer "NETC206_2_L01_P006" (solid, pour order 6): 80.3,13.1 80.5,12.9 80.5,8.8 80.3,8.6 77.5,8.6 77.2,8.3 77.2,7.6 76.6,7 75.9,7 75.7,6.8 75.7,6.1 75.5,5.9 72.6,5.9 72.4,6.1 72.4,7.8 73.2,7.8 73.3,7.9 73.3,8.5 72.4,9.4 70.5,9.4 70.367,9.533 70.367,12.967 70.5,13.1 72.9,13.1
VM on Top Layer "VM_L01_P005" (solid, pour order 5): 65.1,8.8 71.687,8.8 71.687,6.032 64.168,6.032 63.7,6.5 63.7,7.4
VM on Top Layer "VM_L01_P004" (solid, pour order 4): 65.2,16.8 71.787,16.8 71.787,14.032 64.268,14.032 63.8,14.5 63.8,15.4
GND on Bottom Layer "GND_L04_P046" (solid, pour order 46): 0,0 0,48 100,48 100,0
VM on Bottom Layer "VM_L04_P030" (solid, pour order 30): 76,46.3 76,42.2 79.6,42.2 79.6,46.3
VM on Bottom Layer "VM_L04_P031" (solid, pour order 31): 65,46.3 65,42.2 68.6,42.2 68.6,46.3
VM on Bottom Layer "VM_L04_P032" (solid, pour order 32): 53.5,14.3 53.5,10.2 57.1,10.2 57.1,14.3
NetC206_2 on Bottom Layer "NETC206_2_L04_P037" (solid, pour order 37): 80.3,13.1 80.5,12.9 80.5,11.3 80.1,10.9 80.1,8.8 79.9,8.6 77.5,8.6 77.2,8.3 77.2,7.6 76.6,7 75.9,7 75.7,6.8 75.7,6.1 75.5,5.9 72.6,5.9 72.4,6.1 72.4,7.8 73.2,7.8 73.3,7.9 73.3,8.5 72.4,9.4 70.5,9.4 70.367,9.533 70.367,12.967 70.5,13.1 72.9,13.1
VM on Bottom Layer "VM_L04_P036" (solid, pour order 36): 65.1,8.8 71.687,8.8 71.687,6.032 64.168,6.032 63.7,6.5 63.7,7.4
GND on Bottom Layer "GND_L04_P045" (solid, pour order 45): 63.1,13.3 69.5,13.3 69.7,13.1 69.7,10.8 69.6,10.7 68.8,10.7 67.9,9.8 65.1,9.8 64,10.9 62.8,10.9 62.8,13
GND on Bottom Layer "GND_L04_P044" (solid, pour order 44): 63.1,21.3 69.5,21.3 69.7,21.1 69.7,18.8 69.6,18.7 68.8,18.7 67.9,17.8 65.1,17.8 64,18.9 62.8,18.9 62.8,21
GND on Bottom Layer "GND_L04_P042" (solid, pour order 42): 63.1,29.3 69.5,29.3 69.7,29.1 69.7,26.8 69.6,26.7 68.8,26.7 67.9,25.8 65.1,25.8 64,26.9 62.8,26.9 62.8,29
NetP410_3 on Bottom Layer "NETP410_3_L04_P040" (solid, pour order 40): 81,13.1 80.8,12.9 80.8,11.3 81.2,10.9 81.2,8.8 81.4,8.6 97,8.6 97.6,9.2 97.6,13.7 96.8,14.5 93.1,14.5 91.7,13.1
NetP410_1 on Bottom Layer "NETP410_1_L04_P039" (solid, pour order 39): 80.7,22.7 81.1,23.1 81.1,25.5 81.3,25.7 84.9,25.7 85.8,26.6 96.7,26.6 97.2,26.1 97.2,21.3 96.5,20.6 81,20.6 80.7,20.9
NetC205_2 on Bottom Layer "NETC205_2_L04_P038" (solid, pour order 38): 70.367,20.522 70.367,17.733 70.7,17.4 72.4,17.4 73.3,16.5 73.3,15.9 73.2,15.8 72.5,15.8 72.5,14.1 72.9,13.7 90.9,13.7 92.4,15.2 96.6,15.2 97.2,15.8 97.2,19.1 96.3,20 85.7,20 74.4,20 73.7,20.7 70.545,20.7
VM on Bottom Layer "VM_L04_P035" (solid, pour order 35): 65.2,16.8 71.787,16.8 71.787,14.032 64.268,14.032 63.8,14.5 63.8,15.4
VM on Bottom Layer "VM_L04_P034" (solid, pour order 34): 65.1,24.8 71.687,24.8 71.687,22.032 64.168,22.032 63.7,22.5 63.7,23.4
NetC203_2 on Bottom Layer "NETC203_2_L04_P033" (solid, pour order 33): 80.4,22.7 80,23.1 80,25.5 79.8,25.7 77.3,25.7 75.4,27.6 75.4,28.8 75.2,29 70.367,29 70.367,25.833 70.9,25.3 72.5,25.3 73.3,24.5 73.3,23.8 72.4,23.8 72.4,22.1 72.5,22 72.5,21.4 73.8,21.4 74.6,20.6 80.1,20.6 80.4,20.9
+3.3 on Bottom VM (split plane): 54.745,41.545 58.598,37.692 58.598,30.908 50.645,22.955 50.582,22.879 50.536,22.792 50.507,22.698 50.498,22.6 50.498,0.51 0.51,0.51 0.51,47.49 48.8,47.49
VM on Bottom VM (split plane): 99.49,0.51 51.502,0.51 51.502,22.392 59.455,30.345 59.518,30.421 59.564,30.508 59.593,30.602 59.602,30.7 59.602,37.9 59.593,37.998 59.564,38.092 59.518,38.179 59.455,38.255 55.455,42.255 50.221,47.49 99.49,47.49
GND on Bottom VM (split plane): 56.846,37.348 56.847,37.347 56.848,37.346 56.848,30.854 56.847,30.853 56.846,30.852 50.354,30.852 50.353,30.853 50.352,30.854 50.352,37.346 50.353,37.347 50.354,37.348 56.846,37.348
GND on Top GND (split plane): 99.49,0.51 0.51,0.51 0.51,47.49 99.49,47.49

## Other copper
Top GND (plane layer: these items are gaps in the copper):
  rectangle: 91.4,33.9 98.3,40.9
  lines w1.016: 0,0 100,0 100,48 0,48 0,0
Bottom VM (plane layer: these items are gaps in the copper):
  lines w0.254: 49,48 0,48 0,0 51,0
  lines w0.5: 50.1,30.854 ccw(c50.354,30.854) 50.354,30.6 56.846,30.6 ccw(c56.846,30.854) 57.1,30.854 57.1,37.346 ccw(c56.846,37.346) 56.846,37.6 50.354,37.6 ccw(c50.354,37.346) 50.1,37.346 50.1,30.854
  lines w1: 49,48 55.1,41.9 59.1,37.9 59.1,30.7 51,22.6 51,0
  lines w1.016: 0,0 100,0 100,48 0,48 0,0

## Silkscreen, mask and mechanical layers (free items; w line width, h text height)
Top Overlay:
  text "ST" at 2.2,26.2 h1.2
  text "FLT" at 1.001,24.6 h1.2
  text "+5V" at 1.001,23 h1.2
  text "+3V" at 1.001,21.4 h1.2
  text "0" at 3.3,19.9 h1.2
  text "1" at 3.7,18.4 h1.2
  text "2" at 3.3,16.9 h1.2
  text "3" at 3.3,15.4 h1.2
Bottom Overlay:
  lines w0.2: 20.5,6.5 27.75,6.5 27.75,11.25 20.5,11.25 20.5,6.5 ; 28.75,1.5 38.75,1.5 38.75,6.25 28.75,6.25 28.75,1.5
  text "STEP" at 11.2,43.8 h1.2 r90
  text "BRAKE" at 49,43.8 h1.2 r90
  text "GND" at 51.6,43.8 h1.2 r90
  text "DIR" at 13.9,43.7 h1.2 r90
  text "GND" at 16.4,43.7 h1.2 r90
  text "GND" at 20.2,43.7 h1.2 r90
  text "HALL_UX" at 22.7,43.7 h1.2 r90
  text "HALL_V" at 25.2,43.7 h1.2 r90
  text "HALL_WY" at 27.7,43.7 h1.2 r90
  text "+5V" at 30.2,43.7 h1.2 r90
  text "GND" at 34.7,43.7 h1.2 r90
  text "ENC A" at 37.2,43.7 h1.2 r90
  text "ENC B" at 39.7,43.7 h1.2 r90
  text "ENC N" at 42.2,43.7 h1.2 r90
  text "+5V" at 44.7,43.7 h1.2 r90
  text "FeatherDrive" at 26.12,24.987 h5
  text "REV 1.0" at 10.559,19.503 h3.5
  text "+3.3V" at 44.5,11.999 h1.2 r90
  text "ICSP" at 26.349,11.65 h1.2
  text "ENC CS" at 17.6,10.998 h1.2 r90
  text "TEMP" at 47.1,10.949 h1.2 r90
  text "MOSI" at 20.1,8.199 h1.2 r90
  text "GND" at 12.6,7.299 h1.2 r90
  text "SCK" at 15.1,7.299 h1.2 r90
  text "GND" at 42,6.999 h1.2 r90
  text "RTMI" at 35.749,6.65 h1.2
  text "+5V" at 26.8,4.699 h1.2 r90
  text "MISO" at 24.599,4.5 h1.2
  text "MG 2023" at 86.332,1.5 h1
  text "RX" at 44.7,0.4 h1.2
  text "TX" at 47.5,0.4 h1.2
Mechanical 1:
  the board outline again, w0.254

## Text inside footprints (layer, text, board x,y; h text height)
U202: Top Overlay "*" at 59,31.9 h1.27 r180; Top 3D Body "*" at 56.943,31.962 h1.27 r180